# Altium PCB ST01P01E.PcbDoc
Units mil, origin at the board's own origin, x right, y up, seen from the top; angles counter-clockwise.
Board outline 1800 x 1000 mil, 2 copper layers (Top Layer, Bottom Layer), stack 65.8 mil thick; 33 components, 22 nets, 124 pads, 48 vias.
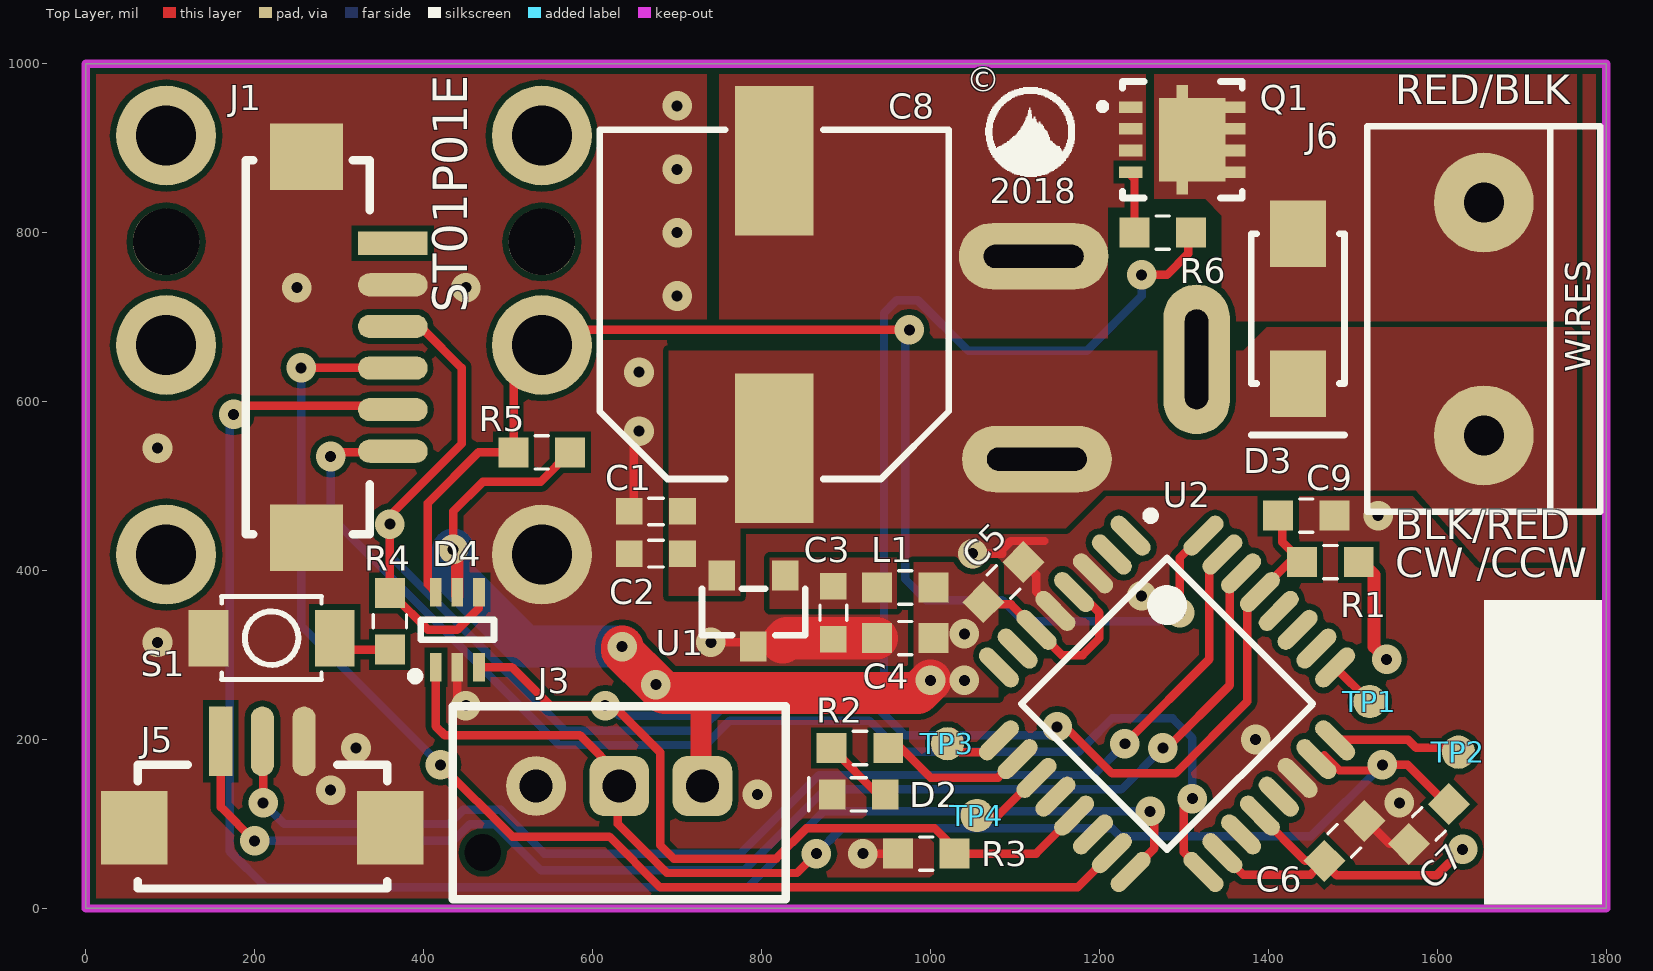
[diagram p0: Top Layer view]
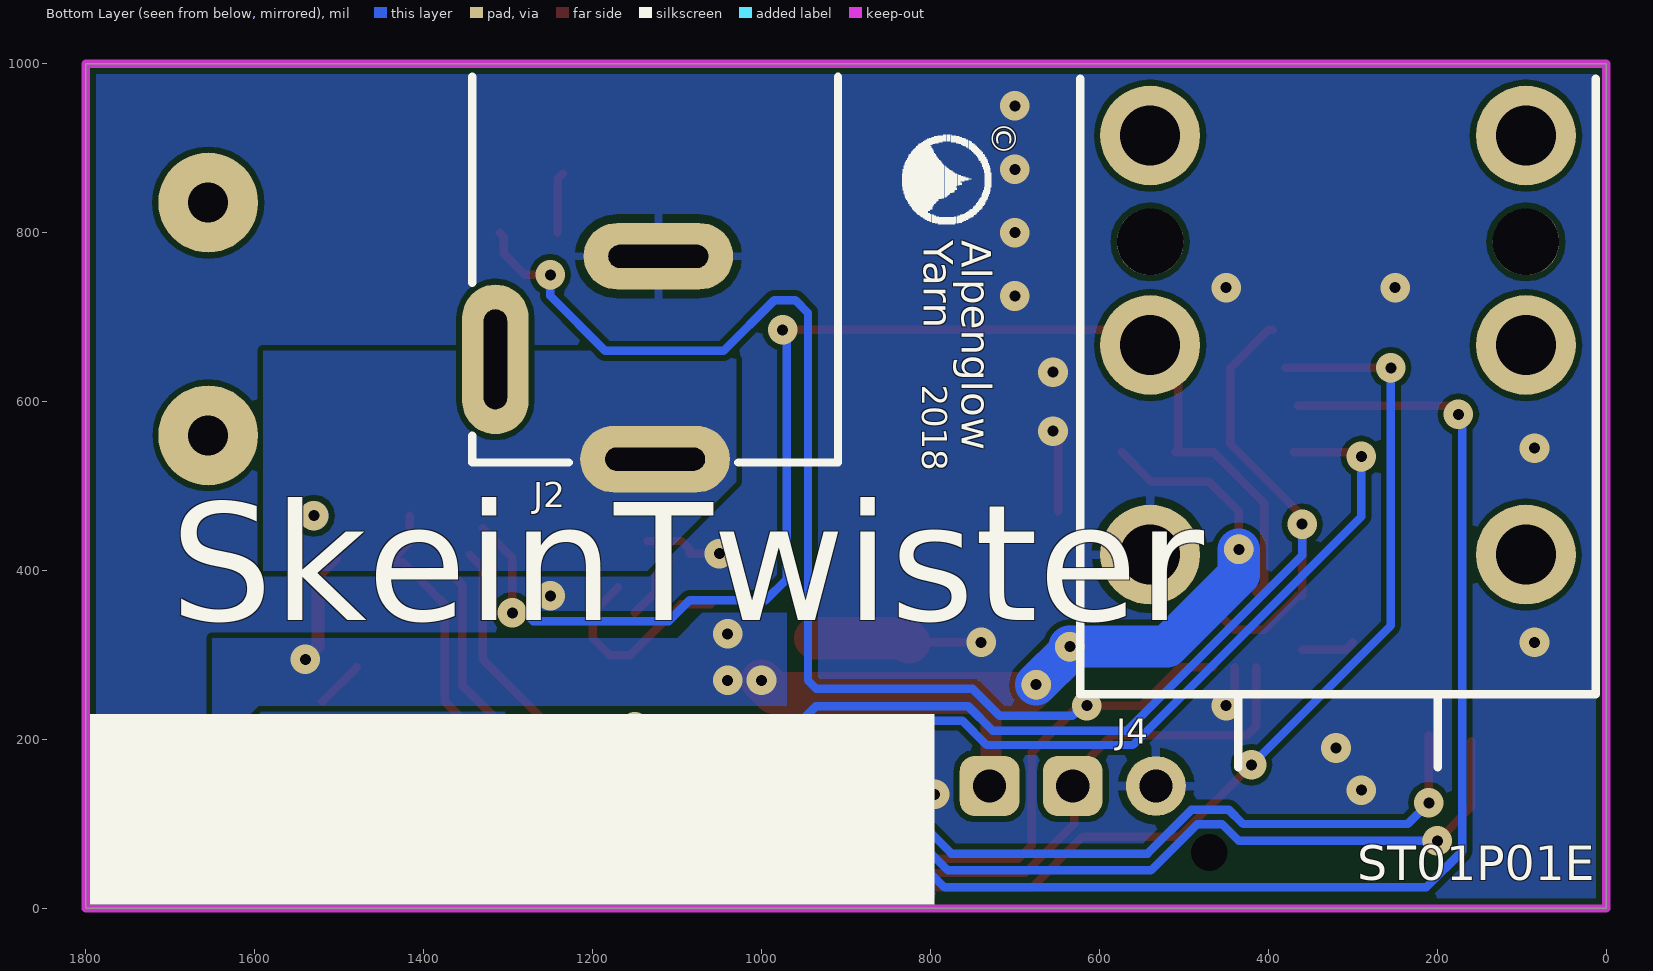
[diagram p1: Bottom Layer view, seen from below]
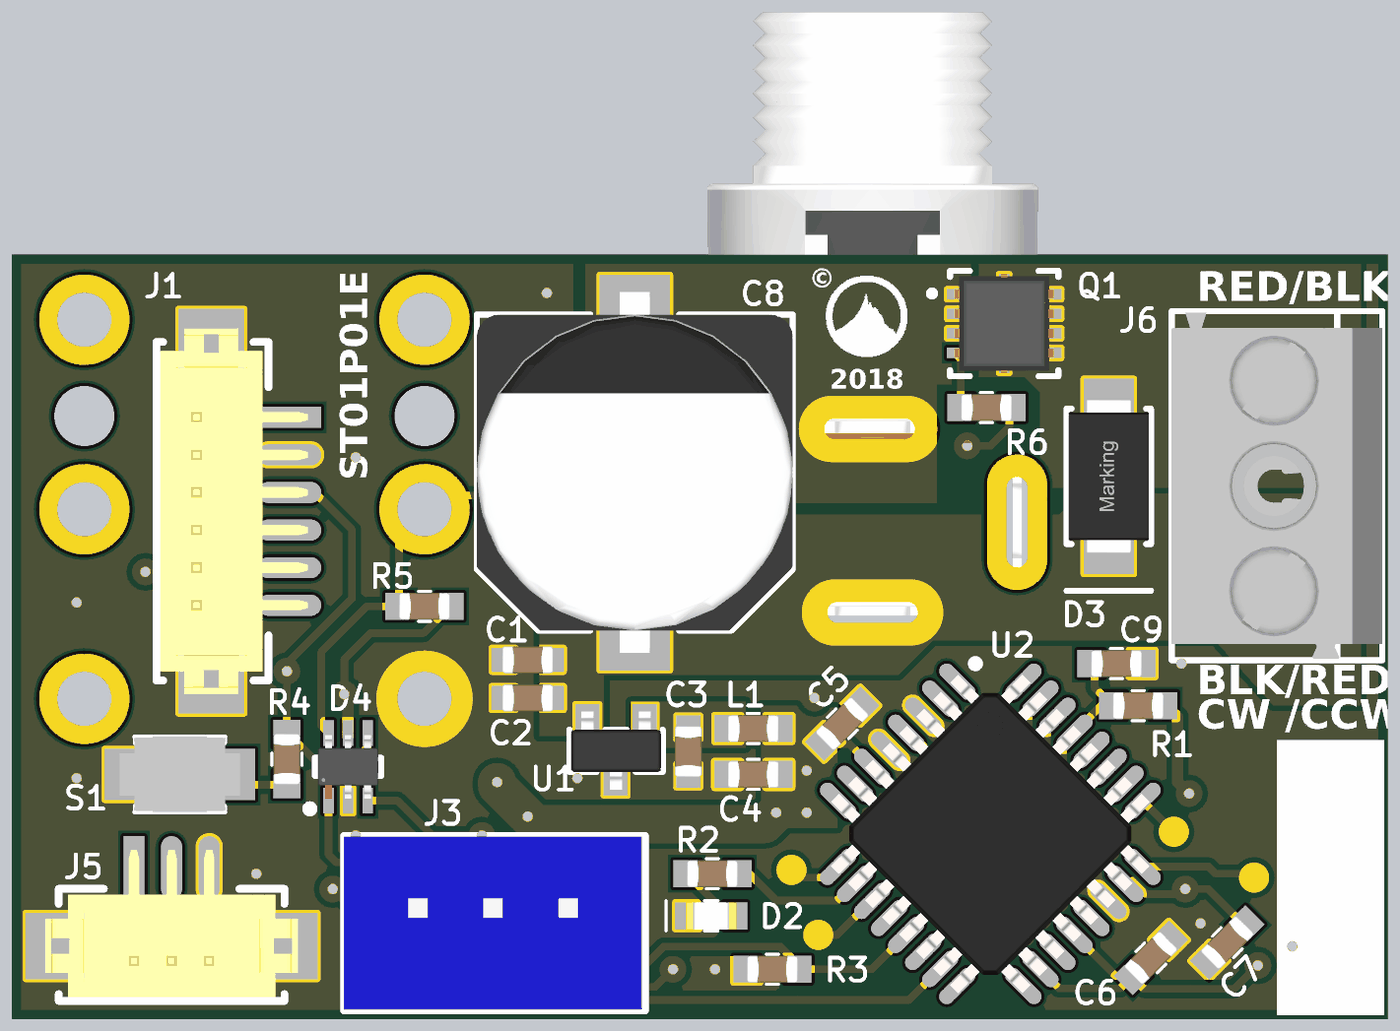
[diagram p2: 3D render of the assembled board from above, using the file's embedded part models]

## Layer stack, top to bottom
Top Solder: solder mask 0.4, Solder Resist, Dk 3.5
Top Layer: signal copper 1.4
Dielectric 1: dielectric 63, FR-4, Dk 4.8
Bottom Layer: signal copper 1.4
Bottom Solder: solder mask 0.4, Solder Resist, Dk 3.5

## Board outline
0,0 0,1000 1800,1000 1800,0

## Design rules (kind name [scope] priority, off if disabled: settings)
Clearance [All] p1: gap=7 ignorepadtopadclearanceinfootprint=FALSE except(0: Arc-Hole Track-Hole SMDPad-Hole THPad-Hole Via-Hole Fill-Hole Poly-Hole Region-Hole Text-Hole)
ComponentClearance [All] p1: gap=10 collisioncheckmode=3 verticalgap=7 showdistances=FALSE
HoleSize [All] p1: absolutevalues=TRUE maxlimit=250 minlimit=1 maxpercent=80.000 minpercent=20.000
MinimumSolderMaskSliver [All] p1: minsoldermaskwidth=4
PolygonConnect PolygonConnect_DIRECT [All vs InPadClass('DIRECT CONN')] p1: thpad.connectstyle=Direct thpad.reliefconductorwidth=10 thpad.reliefentries=4 thpad.polygonreliefangle="90 Angle" thpad.airgapwidth=10 smdpad.connectstyle=Direct smdpad.reliefconductorwidth=10 smdpad.reliefentries=4 smdpad.polygonreliefangle="90 Angle" smdpad.airgapwidth=10 via.connectstyle=Relief via.reliefconductorwidth=10 via.reliefentries=4 via.polygonreliefangle="90 Angle" via.airgapwidth=10
PolygonConnect PolygonConnect_via [All vs IsVia] p2: connectstyle=Direct reliefconductorwidth=10 reliefentries=4 polygonreliefangle="90 Angle" airgapwidth=10
PolygonConnect PolygonConnect_spoke [All vs InPolygonClass('SPOKE_CONN')] p3: connectstyle=Relief reliefconductorwidth=10 reliefentries=4 polygonreliefangle="90 Angle" airgapwidth=10
PolygonConnect [All] p4: connectstyle=Direct reliefconductorwidth=10 reliefentries=4 polygonreliefangle="90 Angle" airgapwidth=10
RoutingVias [All] p1: holewidth=10 width=35 viastyle="Through Hole" minholewidth=10 minwidth=20 maxholewidth=25 maxwidth=50
SilkToSilkClearance [All] p1: silktosilkclearance=1
SilkToSolderMaskClearance [IsPad] p1: minsilkscreentomaskgap=1 clearancetoexposedcopper=TRUE
SolderMaskExpansion [All] p1: expansion=4 istentingtop=FALSE
Width [All] p1: maxlimit=100 minlimit=7 preferedwidth=10
25 further rules are at their usual default settings.

## Classes and differential pairs
polygon class SPOKE_CONN: GND_L02_P034 NONET_L01_P036
pad class "DIRECT CONN": J1-7 J1-8 J5-4 J5-5

## Components (designator, comment, footprint, x,y, rotation, side; value= is the part's Value field where it differs from the comment)
C1 "1.0" 0603#1 675,470 r180 top
C2 "0.1" 0603#1 675,420 r180 top
C3 "0.1" 0603#1 885,350 r270 top
C4 "10" 0603#2 970,320 r180 top
C5 "0.1" 0603#2 1086.34,386.33 r45 top
C6 "0.1" 0603#2 1490,80 r45 top
C7 "0.1" 0603#2 1590,100 r225 top
C8 "820" CAP-10MM 815,715 r90 top
C9 "0.1" 0603#2 1445,465 r0 top
D2 "LED" 0603+ 915,135 r180 top
D3 "DIODE, SM SIG" SMA 1435,710 r90 top value=SMA
D4 "TVS" SOT-363 440,330 r90 top
J1 "ISP Program" DF13C-6P-1.25V 355.67,787.4 r270 top
J2 "POWER" "CONN-JACK-2MM - slots - M3" 1126.02,531.89 r180 bottom
J3 "KNOB" JST-XH-3 533.15,145 r180 top locked
J4 "FOOT PEDAL" AUDIO-6.35MM-RTA 317.56,666.97 r180 bottom locked
J5 "SERIAL" DF13C-3P-1.25V 160,190 r0 top
J6 "?" OSTTE021104 1655,560 r90 top
L1 "FERRITE, 0603" 0603#2 970,380 r0 top
Q1 "N" DFN8_3X3MM 1298.19,910 r0 top
R1 "10.0k" 0603#2 1473.46,410 r0 top
R2 "1.00k" 0603#2 916.53,190 r0 top
R3 "10.0k" 0603#2 995,65 r0 top
R4 "DNP (100)" 0603#2 360,340 r270 top
R5 "10.0k" 0603#2 540,540 r0 top
R6 "100" 0603#2 1275,800 r0 top
S1 "DNP" PB-3.0X2.5-SMT 220,320 r0 top
TP1 "TESTPOINT" TP-1.0MM 1520,245 r90 top
TP2 "TESTPOINT" TP-1.0MM 1625,185 r90 top
TP3 "TESTPOINT" TP-1.0MM 1020,195 r90 top
TP4 "TESTPOINT" TP-1.0MM 1055,110 r90 top
U1 "TLV76050" SOT-23 828,394.25 r180 top
U2 "ATMEGA328P_v2" TQFP-32 1280.04,242.23 r315 top

## Footprints (in the part's own frame and the unit in brackets; to place one, negate y for a bottom-side part, rotate by r counter-clockwise, add the part's x,y. Pads: shape width x height; smd on the part's side, far side on the other; paste and mask are expansions set on the pad)
0603#1 [mm]
  rect 0.8x0.8 smd: 1(-0.8,0) 2(0.8,0)
  silkscreen extent -0.22,-0.4 0.23,0.4, body extent -0.85,-0.45 0.85,0.45, height 0.9
0603#2 [mm]
  rect 0.9x0.9 smd: 1(-0.85,0) 2(0.85,0)
  silkscreen extent -0.2,-0.5 0.2,0.5, body extent -0.85,-0.45 0.85,0.45, height 0.9
0603+ [mm]
  rect 0.8x0.9 smd: 1(-0.8,0) 2(0.8,0)
  silkscreen extent -0.23,-0.5 1.5,0.5, body extent -0.85,-0.45 0.85,0.45, height 0.75
AUDIO-6.35MM-RTA [mm]
  round 2 hole 2 unplated: 0(-5.65,3.1) 1(5.65,3.1)
  round 3 hole 1.8: 2(-5.65,6.3) 3(5.65,6.3) 4(-5.65,0) 5(5.65,0) 6(-5.65,-6.3) 7(5.65,-6.3)
  silkscreen extent -7.75,-12.7 7.75,8, body extent -7.75,-13.5 7.75,19.5, height 12.8
CAP-10MM [mm] "Aluminum Electrolytic Capacitor, Body 10.30x10.30x10.30mm, IPC Low Density"
  rect 4.5x2.35 smd: 1(-4.325,0) 2(4.325,0)
  silkscreen extent -5.25,-5.25 5.25,5.25, body extent -6,-5.25 6,5.25, height 10.5
"CONN-JACK-2MM - slots - M3" [mm]
  oval 4.5x2 hole 0.7 slot 3 at 0 deg: 1(0,0) 2(0.1,6.1)
  oval 2x4.5 hole 0.7 slot 3 at 90 deg: 3(-4.8,3)
  silkscreen extent -5.5,-0.1 5.5,11.5, body extent -5.5,-0.1 5.5,19.95, height 12.11
DF13C-3P-1.25V [mm]
  rect 0.7x2.1 smd: 1(0,0.2)
  oval 0.7x2.1 smd: 2(1.25,0.2) 3(2.5,0.2)
  rect 2x2.2 smd: 4(-2.6,-2.4) 5(5.1,-2.4)
  silkscreen extent -2.5,-4.23 5,-0.5, body extent -2.95,-4.1 5.45,0.8, height 4.77
DF13C-6P-1.25V [mm]
  rect 0.7x2.1 smd: 1(0,0.2)
  oval 0.7x2.1 smd: 2(1.25,0.2) 3(2.5,0.2) 4(3.75,0.2) 5(5,0.2) 6(6.25,0.2)
  rect 2x2.2 smd: 7(-2.6,-2.4) 8(8.85,-2.4)
  silkscreen extent -2.5,-4.23 8.75,-0.5, body extent -2.95,-4.1 9.2,0.8, height 4.77
DFN8_3X3MM [mm]
  rect 0.35x0.7 smd: D(0,-1.3) D(0,1.3)
  rect 2x2.5 smd paste-1.245: D(0.3,0)
  rect 0.7x0.35 smd: D(1.55,-0.975) D(1.55,-0.325) D(1.55,0.325) D(1.55,0.975) G(-1.55,-0.975) S(-1.55,-0.325) S(-1.55,0.325) S(-1.55,0.975)
  silkscreen extent -2.5,-1.75 1.8,1.75, body extent -1.65,-1.65 1.65,1.66, height 0.9
JST-XH-3 [mm]
  round 0 hole 1.1 unplated mask+0.6: 0(1.6,2)
  round 1.8 hole 1: 1(0,0)
  rrect50% 1.8x1.8 hole 1: 2(-2.5,0) 3(-5,0)
  silkscreen extent -7.5,-2.4 2.5,3.4, body extent -7.4,-2.38 2.5,3.38, height 7
OSTTE021104 [mm]
  round 3 hole 1.2: 1(0,0) 2(7,0)
  silkscreen extent -2.3,-3.5 9.3,3.5, body extent -2.26,-3.5 9.26,3.5, height 8.41
PB-3.0X2.5-SMT [mm]
  rect 1.2x1.7 smd: 1(-1.9,0) 2(1.9,0)
  silkscreen extent -1.5,-1.25 1.5,1.25, body extent -2,-1.25 2,1.25, height 1.6
SMA [mm] "Molded Diode, 2-Leads, Body 4.25x2.67mm, IPC Medium Density"
  rect 2x1.68 smd: A(2.25,0) K(-2.25,0)
  silkscreen extent -3.8,-1.4 2.25,1.4, body extent -2.56,-1.33 2.56,1.34, height 2.26
SOT-23 [mm]
  rect 0.8x0.9 smd: 1(0,0) 2(1.905,0) 3(0.965,2.14)
  silkscreen extent -0.6,0.4 2.5,1.8, body extent -0.55,-0.2 2.45,2.4, height 1.1
SOT-363 [mm] "SC-70"
  rect 0.85x0.35 smd: 1(-1.125,0.65) 2(-1.125,0) 3(-1.125,-0.65) 4(1.125,-0.65) 5(1.125,0) 6(1.125,0.65)
  silkscreen extent -1.52,-1.1 0.3,1.39, body extent -1.05,-1 1.05,1, height 0.95
TP-1.0MM [mm]
  round 1 smd paste-2.515 mask+0: 1(0,0)
  body extent -0.5,-0.5 0.5,0.5
TQFP-32 [mm]
  oval 1.5x0.5 smd: 1(-4.35,2.8) 2(-4.35,2) 3(-4.35,1.2) 4(-4.35,0.4) 5(-4.35,-0.4) 6(-4.35,-1.2) 7(-4.35,-2) 8(-4.35,-2.8) 17(4.35,-2.8) 18(4.35,-2) 19(4.35,-1.2) 20(4.35,-0.4) 21(4.35,0.4) 22(4.35,1.2) 23(4.35,2) 24(4.35,2.8)
  oval 0.5x1.5 smd: 9(-2.8,-4.35) 10(-2,-4.35) 11(-1.2,-4.35) 12(-0.4,-4.35) 13(0.4,-4.35) 14(1.2,-4.35) 15(2,-4.35) 16(2.8,-4.35) 25(2.8,4.35) 26(2,4.35) 27(1.2,4.35) 28(0.4,4.35) 29(-0.4,4.35) 30(-1.2,4.35) 31(-2,4.35) 32(-2.8,4.35)
  silkscreen extent -4.47,-3.1 3.1,3.77, body extent -4.5,-4.5 4.5,4.5, height 1.1

## Part data
C1 C2 C3 C4 C5 C6 C7 C9: library part CAP
C8: library part CAP+, Voltage=25V
D4: library part "TVS, USB"
J1: library part CONN-6, Connector Series=DF3-6P
J2 J4: library part CONN-2
J3 J5: library part CONN-3
J6: library part Motor
Q1: library part "FET-N, SOT23", "N-Channel MOSFET"
R1 R2 R3 R4 R5 R6: library part RES
S1: library part SW-PB, "Switch", LatestRevisionDate=17-Jul-2002, LatestRevisionNote="Re-released for DXP Platform.", PackageDescription="Switch; 2 Leads", PackageReference=SPST-2, Published=24-Mar-1999, Publisher="Altium Limited"
U1: library part TLV760

## Via types
v1: diameter 35, hole 13, Top Layer to Bottom Layer, tented both sides, 48 vias

## Nets (pads, with @x,y where several pads share a name; then routed paths per layer and width w, separated by ;. In a path a pad name is that pad's centre, name@x,y a point inside that pad or via, vN(x,y) a via of type N, cw(c..) or ccw(c..) an arc to the next point about the centre after c; other vN are vias at no path point)
5V: C4.1 C5.1 C6.1 D4.5 J3.3 L1.2 R1.2 R5.2 U2.4 U2.6 U2.18 U2.20 | length 1897.1
  Top Layer w10: v1(435,425) 435,470 470,505 538.47,505 R5.2 ; C5.1@1060,360 1095.46,360 U2.6 1155.46,300 1180,300 1200,320 1200,350 U2.4@1170,380 ; U2.18@1340,70 1370,40 1450,40 1463.66,53.66 C6.1@1463.66,56.34 ; U2.20 1443.66,56.34 C6.1@1446.34,56.34 ; C6.1 C6.1@1463.66,56.34 ; v1(1630,70) 1599.28,39.28 1480.72,39.28 C6.1@1463.66,56.34
  Top Layer w15: v1(435,425) 440,420 D4.5 D4.5@440,370 ; R1.2@1505,415 1525,395 1525,310 v1(1540,295)
  Top Layer w25: J3.3@725,145 728.43,148.43 728.43,253.43 730,255
  Top Layer w50: v1(635,310) 635,305 v1(675,265) 685,255 730,255 985,255 v1(1000,270)
  Bottom Layer w50: v1(435,425) 435,395.17 520.17,310 v1(635,310) 635,305 v1(675,265)
  other v1: 1040,270 1040,325
5V_UF: C3.1 L1.1 U1.1
12V: C1.1 C2.1 C8.1 D3.K J2.1 J6.1 U1.2
FOOTPEDAL: D4.6 J4.4 R5.1 U2.32 | length 1585.9
  Top Layer w10: D4.6 405,383.7 405,480 465,540 R5.1@510,540 ; R5.1 506.54,636.54 545,675 575,675 585,685 v1(975,685) ; v1(1295,350) 1295,415 U2.32@1330,450
  Bottom Layer w10: v1(975,685) 970,680 970,390 995,365 1085,365 1110,340 1270,340 1280,350 v1(1295,350)
GND: C1.2 C2.2 C3.2 C4.2 C5.2 C6.2 C7.2 C8.2 C9.2 D2.2 D4.2 J1.2 J1.7 J1.8 J2.2 J3.1 J4.6 J5.3 J5.4 J5.5 Q1.S R3.1 S1.1 U1.3 U2.3 U2.5 U2.22 | length 622.9
  Top Layer w10: D4.2 440,250 v1(450,240) ; C1.2@648.5,470 648.5,558.5 v1(655,565) ; v1(740,315) 821.25,315 824.25,312 ; v1(920,65) R3.1 ; v1(1050,420) 1085,420 1085,425 1095,435 1135,435 ; C5.2 1125,395 1125,375 U2.5@1150,350 ; C6.2@1515,105 1543.67,76.33 C7.2
  Top Layer w50: 825,315 830,320 C4.2
  Bottom Layer w10: J2.2@1048.23,770 J2.2@1048.79,769.44
  other v1: 1675,95 1555,125 795,135 290,140 320,190 1385,200 85,315 1250,370 1530,465 85,545 655,635 700,725 250,735 450,735 700,800 700,875 700,950
KNOB: C7.1 D4.1 J3.2 U2.23 | length 1567
  Top Layer w10: D4.1 414.41,215.59 425,205 585,205 635,155 J3.2@635,120 ; J3.2@630,145 630,100 688,42 842,42 v1(865,65) ; U2.23@1460,175 1466.14,181.14 1483.96,163.32 1528.32,163.32 v1(1535,170) 1565,170 C7.1@1610,125
  Bottom Layer w10: v1(865,65) 895,95 1215,95 1224.5,85.5 1450.5,85.5 v1(1535,170)
LED: R2.2 U2.10 | length 172.8
  Top Layer w10: R2.2 965,190 1000,155 1080,155 U2.10@1100,175
MISO: J1.5 U2.16 | length 1943.3
  Top Layer w10: v1(175,585) 185,595 J1.5@365,595 ; U2.16 1265,71.3 1265,110 v1(1260,115)
  Bottom Layer w10: v1(175,585) 170.5,580.5 170.5,67.78 213.28,25 783.28,25 873.28,115 v1(1260,115)
MOSI: J1.4 U2.15 | length 1534.8
  Top Layer w10: v1(255,640) J1.4@380,640 ; v1(420,170) 505,85 620,85 680,25 1174.16,25 U2.15
  Bottom Layer w10: v1(255,640) 255,335 v1(420,170)
NetD2_1: D2.1 R2.1 | length 89.7
  Top Layer w10: R2.1 938.07,135 D2.1 D2.1@950,135
NetD3_A: D3.A J6.2 Q1.D
NetQ1_G: Q1.G R6.1 | length 72.7
  Top Layer w10: Q1.G@1235,870 1241.54,863.46 R6.1
NetR4_2: R4.2 S1.2 | length 63.5
  Top Layer w10: S1.2@300,315 308.47,306.53 R4.2
NetTP1_1: TP1.1 U2.25 | length 57.6
  Top Layer w10: U2.25 1519.47,245 TP1.1
NetTP2_1: TP2.1 U2.24 | length 164.2
  Top Layer w10: U2.24 1479.5,199.5 1565.5,199.5 1575,190 1625,190 TP2.1@1635,180
NetTP3_1: TP3.1 U2.9 | length 76.2
  Top Layer w10: TP3.1@1026.33,208.44 1026.33,193.67 1035,185 1070,185 U2.9@1080,195
NetTP4_1: TP4.1 U2.11 | length 83.6
  Top Layer w10: TP4.1@1060,110 1080,110 U2.11@1125,155
ON/OFF: D4.3 R3.2 R6.2 U2.13 | length 2162.1
  Top Layer w10: D4.3 504.29,285.71 550,240 v1(615,240) 625,240 680,185 680,75 696,59 817.28,59 853,94.72 1005.28,94.72 1035,65 1125,65 U2.13@1160,100 ; v1(1250,750) 1280,750 1305,775 1305,795 R6.2@1310,800
  Bottom Layer w10: v1(615,240) 620,240 632,228 718,228 750,260 935,260 945,270 945,705 960,720 985,720 1045,660 1185,660 1250,725 v1(1250,750)
RESET: C9.1 D4.4 J1.3 R1.1 R4.1 U2.29 | length 2012.3
  Top Layer w10: R4.1@360,370 v1(360,455) 360,465 445,550 445,640 400,685 J1.3@395,685 ; R4.1@365,370 405,330 440,330 465.59,355.59 D4.4 ; D4.4@465,374.29 D4.4@465,375 ; v1(1150,215) 1160,215 1215,160 1290,160 1375,245 1375,359.47 U2.29 ; U2.29@1390,375 1425,410 R1.1 1416.54,433.46 C9.1@1416.54,465
  Bottom Layer w10: v1(360,455) 360,417.84 567.34,210.5 726.46,210.5 755.35,239.39 935.61,239.39 970,205 1140,205 v1(1150,215)
RXD: J5.1 U2.30 | length 1548.5
  Top Layer w10: J5.1 160,120 v1(200,80) ; v1(1275,190) 1280,190 1354.24,264.24 1354.24,383.25 U2.30
  Bottom Layer w10: v1(200,80) 434.73,80 434.86,80.14 ; 435,80 454.91,99.91 484.1,99.91 539.01,45 779.24,45 875.24,141 1226,141 v1(1275,190)
SCK: J1.6 U2.17 | length 1510.8
  Top Layer w10: v1(290,535) 295,540 J1.6@370,540 ; v1(1310,130) 1300,120 1300,66.37 U2.17
  Bottom Layer w10: v1(290,535) 290,463.8 560.3,193.5 733.5,193.5 762.39,222.39 927.61,222.39 964.5,185.5 1175.5,185.5 1185,195 1215,225 1286.72,225 1310,201.72 v1(1310,130)
TXD: J5.2 U2.31 | length 1469.5
  Top Layer w10: v1(210,125) J5.2@210,205 ; v1(1230,195) 1230,200 1232.5,197.5 1330,295 1330,403.55 U2.31
  Bottom Layer w10: v1(210,125) 235,100 430,100 446.91,116.91 491.14,116.91 543.05,65 775.2,65 868.2,158 1193,158 v1(1230,195)
pads on no net: J1.1 J2.3 J3.0 J4.0 J4.1 J4.2 J4.3 J4.5 J4.7 U2.1 U2.2 U2.7 U2.8 U2.12 U2.14 U2.19 U2.21 U2.26 U2.27 U2.28

## Polygon pours and split planes (outlines as drawn)
GND on Bottom Layer "GND_L02_P034" (solid, remove dead copper, pour order 34): 0,1000 0,0 1800,0 1800,1000
12V on Bottom Layer "12V_L02_P018" (solid, remove dead copper, pour order 18): 1030,660 1030,505 1135,400 1590,400 1590,660
5V on Bottom Layer "5V_L02_P028" (solid, remove dead copper, pour order 28): 970,350 970,240 1595,240 1605,230 1605,52.5 1650,52.5 1650,230 1650,320 1100,320 1070,350
GND on Top Layer "GND_L01_P036" (solid, remove dead copper, pour order 36): 0,1000 0,0 1800,0 1800,1000 1710,1000 1710,650 735,650 735,1000
12V on Top Layer "12V_L01_P026" (solid, remove dead copper, pour order 26): 690,660 690,370 775,370 775,450 1160,450 1205,495 1574.15,495 1650.06,410 1765,410 1765,690 1400,690 1370,660
NetD3_A on Top Layer "NETD3_A_L01_P022" (solid, remove dead copper, pour order 22): 1265,990 1265,840 1325,840 1345,820 1345,695 1765,695 1765,990
GND on Top Layer "GND_L01_P024" (solid, remove dead copper, pour order 24): 1255,990 1255,830 1210,830 1210,675 750,675 750,990
5V_UF on Top Layer "5V_UF_L01_P032" (solid, remove dead copper, pour order 32): 810,415 810,355 960,355 960,415
5V on Top Layer "5V_L01_P030" (solid, remove dead copper, pour order 30): 980,410 980,250 1080,250 1080,410

## Keep-outs
Keep-Out Layer:
  the board outline again, w10

## Silkscreen, mask and mechanical layers (free items; w line width, h text height)
Top Overlay:
  drawing of 227 lines, arcs and shapes, not listed
  text "©" at 1042.5,957 h50
  text "RED/BLK" at 1550,940 h60
  text "2018" at 1070,825 h50
  text "ST01P01E" at 465,705 h70 r90
  text "BLK/RED" at 1550,425 h60
  text "CW /CCW" at 1550,380 h60
Bottom Overlay:
  drawing of 227 lines, arcs and shapes, not listed
  text "©" at 737.34,931.08 h50 r90
  text "Alpenglow" at 775,791 h60 r90
  text "Y" at 820,791 h60 r90
  text "arn" at 820,766 h60 r90
  text "2018" at 820,620 h50 r90
  text "SkeinTwister" at 1700,295 h240
  text "ST01P01E" at 295,20 h70
Mechanical 3:
  the board outline again, w3.94
Drill Drawing:
  lines w10: 2237.29,450.61 2253.96,450.61 2253.96,433.94 2287.29,433.94 2287.29,450.61 2303.96,450.61 2303.96,483.94 2287.29,483.94 2287.29,500.61 2253.96,500.61 2253.96,483.94 2237.29,483.94 2237.29,450.61 ; 2237.29,600.61 2253.96,600.61 2270.62,583.94 2287.29,600.61 2303.96,600.61 2287.29,617.27 2303.96,633.94 2287.29,633.94 2270.62,650.61 2253.96,633.94 2237.29,633.94 2253.96,617.27 2237.29,600.61 ; 2237.29,750.61 2253.96,750.61 2270.62,733.94 2287.29,750.61 2303.96,750.61 2287.29,767.27 2303.96,783.94 2287.29,783.94 2270.62,800.61 2253.96,783.94 2237.29,783.94 2253.96,767.27 2237.29,750.61 ; 2237.29,883.94 2303.96,883.94 2303.96,950.61 2237.29,950.61 2237.29,883.94 ; 2237.29,1033.94 2270.62,1050.61 2303.96,1033.94 2287.29,1067.27 2303.96,1100.61 2270.62,1083.94 2237.29,1100.61 2253.96,1067.27 2237.29,1033.94 ; 2237.29,1183.94 2270.62,1200.61 2303.96,1183.94 2287.29,1217.27 2303.96,1250.61 2270.62,1233.94 2237.29,1250.61 2253.96,1217.27 2237.29,1183.94 ; 2237.29,1400.61 2303.96,1400.61 2270.62,1333.94 2237.29,1400.61 ; 2250.62,607.27 2260.62,607.27 2270.62,597.27 2280.62,607.27 2290.62,607.27 2280.62,617.27 2290.62,627.27 2280.62,627.27 2270.62,637.27 2260.62,627.27 2250.62,627.27 2260.62,617.27 2250.62,607.27 ; 2250.62,1047.27 2270.62,1057.27 2290.62,1047.27 2280.62,1067.27 2290.62,1087.27 2270.62,1077.27 2250.62,1087.27 2260.62,1067.27 2250.62,1047.27
  lines w15: 2177.5,388.94 6056.47,388.94 ; 2177.5,1438.94 6056.47,1438.94 ; 2728.38,238.94 2728.38,1588.94 ; 3426.19,238.94 3426.19,1588.94 ; 4771.79,238.94 4771.79,1588.94 ; 5277.67,238.94 5277.67,1588.94 ; 2177.5,238.94 6056.47,238.94 6056.47,1588.94 2177.5,1588.94 2177.5,238.94
  text "ST01P01E NOTES: / 1. BOARD IS FR-4, 1 OZ CU BOTH SIDES, 1/16\" THICK / 2. SOLDERMASK IS RED, BOTH SIDES / 3. FINISH IS HASL / 4. SILKSCREEN IS WHITE, BOTH SIDES / 5. NOTE PLATED SLOTS / 6. CATHODES ARE MARKED ON DIODES" at 20,2210 h100
  text "Symbol" at 2267.5,1483.94 h72
  text "Hit Count" at 2773.38,1483.94 h72
  text "Finished Hole Size" at 3471.19,1483.94 h72
  text "Plated" at 4816.79,1483.94 h72
  text "Hole Type" at 5322.67,1483.94 h72
  text "1" at 2773.38,1333.94 h60
  text "43.31mil (1.100mm)" at 3471.19,1333.94 h60
  text "NPTH" at 4816.79,1333.94 h60
  text "Round" at 5322.67,1333.94 h60
  text "2" at 2773.38,1183.94 h60
  text "47.24mil (1.200mm)" at 3471.19,1183.94 h60
  text "PTH" at 4816.79,1183.94 h60
  text "Round" at 5322.67,1183.94 h60
  text "2" at 2773.38,1033.94 h60
  text "78.74mil (2.000mm)" at 3471.19,1033.94 h60
  text "NPTH" at 4816.79,1033.94 h60
  text "Round" at 5322.67,1033.94 h60
  text "3" at 2773.38,883.94 h60
  text "27.56mil (0.700mm)" at 3471.19,883.94 h60
  text "PTH" at 4816.79,883.94 h60
  text "Slot" at 5322.67,883.94 h60
  text "3" at 2773.38,733.94 h60
  text "39.37mil (1.000mm)" at 3471.19,733.94 h60
  text "PTH" at 4816.79,733.94 h60
  text "Round" at 5322.67,733.94 h60
  text "6" at 2773.38,583.94 h60
  text "70.87mil (1.800mm)" at 3471.19,583.94 h60
  text "PTH" at 4816.79,583.94 h60
  text "Round" at 5322.67,583.94 h60
  text "48" at 2773.38,433.94 h60
  text "13.00mil (0.330mm)" at 3471.19,433.94 h60
  text "PTH" at 4816.79,433.94 h60
  text "Round" at 5322.67,433.94 h60
  text "65 Total" at 2773.38,283.94 h60
  text "Slot definitions :" at 2267.5,138.97 h60
  text "Routed Path Length" at 3300.19,138.97 h60
  text "= Calculated from tool start centre position to tool end centre position." at 4402.86,138.97 h60
  text "Hole Length" at 3300.19,38.99 h60
  text "= Routed Path Length + Tool Size = Slot length as defined in the PCB layout" at 3992.99,38.99 h60

## Dimensions
1800,0 to 1800,1000 on Drill Drawing
0,1000 to 1800,1000 on Drill Drawing

## Text inside footprints (layer, text, board x,y; h text height)
J6: Top Overlay "WIRES" at 1780.98,634.8 h30 r90